# Altium PCB top.PcbDoc (part 2 of 2)
Units mm, origin at the board's own origin, x right, y up, seen from the top; angles counter-clockwise.
Board outline 63 x 37 mm, 4 copper layers (L1 (SIG/PWR), L2 (GND), L3 (GND), L4 (SIG/PWR)), stack 1.586 mm thick; 82 components, 50 nets, 261 pads, 300 vias.
Unrouted connection lines stored in the file: 3.
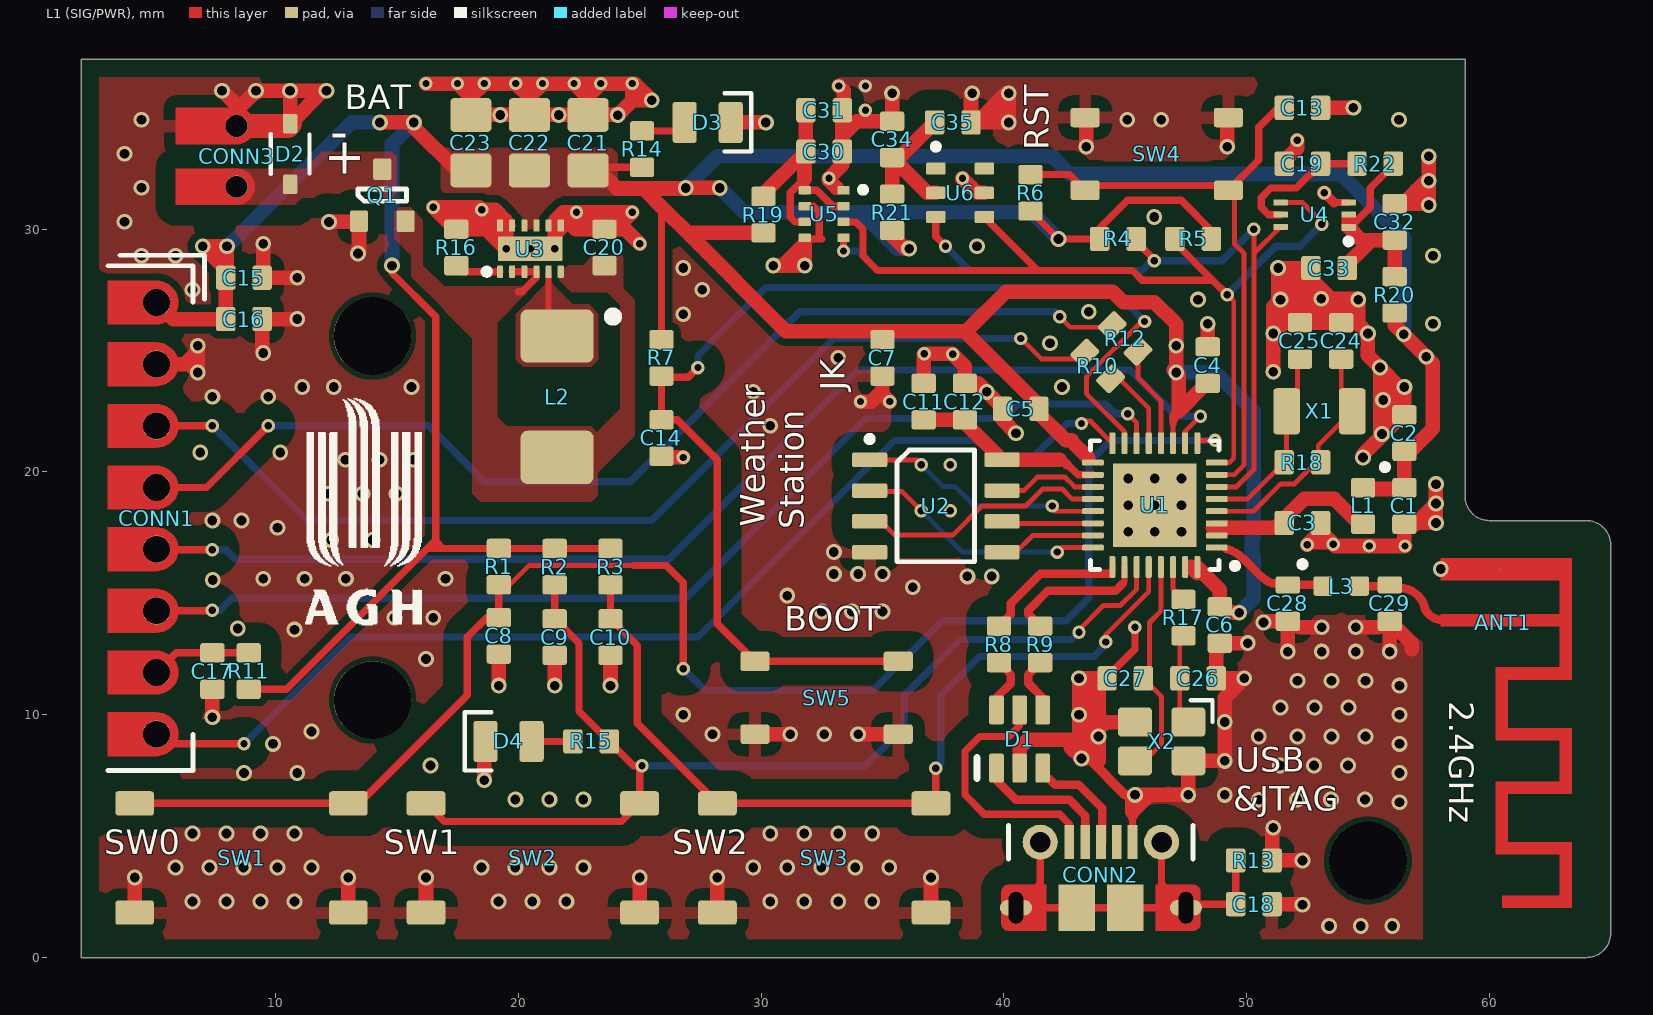
[diagram p0: L1 (SIG/PWR) view]

## Via types
v1: diameter 0.65, hole 0.4, L1 (SIG/PWR) to L4 (SIG/PWR), tented both sides, 228 vias
v2: diameter 0.55, hole 0.3, L1 (SIG/PWR) to L4 (SIG/PWR), tented both sides, 60 vias
v3: diameter 0.6, hole 0.4, L1 (SIG/PWR) to L4 (SIG/PWR), tented both sides, 9 vias
v4: diameter 0.5, hole 0.3, L1 (SIG/PWR) to L4 (SIG/PWR), tented both sides, 3 vias

## Nets (pads, with @x,y where several pads share a name; then routed paths per layer and width w, separated by ;. In a path a pad name is that pad's centre, name@x,y a point inside that pad or via, vN(x,y) a via of type N, cw(c..) or ccw(c..) an arc to the next point about the centre after c; other vN are vias at no path point) (continued)
USB_N: (continued)
  L1 (SIG/PWR) w0.35: D1.1 39.7,7.3 40.5,6.5 42.7,6.5 43.35,5.85 CONN2.2
USB_P: CONN2.3 D1.3 | length 4.7
  L1 (SIG/PWR) w0.35: D1.3 41.6,7.62 42.02,7.2 42.11,7.11 43.094,7.11 44.06,6.144 44.06,4.75 CONN2.3
USB_P_N: D1.6 R8.2 | length 2.4
  L1 (SIG/PWR) w0.35: D1.6 39.7,10.705 40.295,11.3 40.295,11.655 R8.2
USB_P_P: D1.4 R9.2 | length 2.4
  L1 (SIG/PWR) w0.35: R9.2 41.005,11.655 41.005,11.3 41.6,10.705 D1.4
VBAT+: CONN3.1 D2.1 Q1.3
VBUS: CONN2.1 D1.5 | length 10.7
  L1 (SIG/PWR) w0.3: D1.5 40.65,9.55 40.2,9.1 39,9.1 38.4,8.5 38.4,6.7 39.2,5.9 42.3,5.9 42.7,5.5 CONN2.1
VIN: C20.2 L2.2 Q1.2 U3.2 U3.3 U3.4 U3.6 | length 2.2
  L1 (SIG/PWR) w0.3: U3.2 U3.4 20.75,28.025 20.15,27.425 20,27.425
XTAL_32K_N: C25.2 R18.1 U1.5 X1.2 | length 7.9
  L1 (SIG/PWR) w0.2: U1.5 50.034,18.884 R18.1 51.65,20.5 X1.2 ; X1.2@51.55,22.5 52.1,23.05 C25.2@52.1,24.65
XTAL_32K_P: C24.2 R18.2 U1.4 X1.1 | length 10
  L1 (SIG/PWR) w0.2: U1.4 50.284,18.384 51.409,19.509 51.973,19.509 52.864,20.4 52.95,20.4 52.95,21.1 X1.1 ; C24.2 53.9,22.85 X1.1@54.25,22.5
XTAL_N: C27.2 U1.29 X2.3 | length 9.3
  L1 (SIG/PWR) w0.2: X2.3 45.8,8.1 46.5,8.8 46.5,10.75 C27.2 46,11.75 46,13.8 46.471,14.271 U1.29
XTAL_P: R17.2 U1.30 | length 1.5
  L1 (SIG/PWR) w0.2: U1.30 46.971,15.179 R17.2
XTAL_P_RES: C26.2 R17.1 X2.1 | length 4
  L1 (SIG/PWR) w0.2: C26.2@47.4,11.65 C26.2 ; R17.1 47.25,13.1 C26.2 ; X2.1 47.25,10.05 C26.2
pads on no net: CONN2.4 U6.1 U6.6
copper on no net: | length 1.3
  L1 (SIG/PWR) w0.6: 10.6,34.35 10.6,35.7

## Polygon pours and split planes (outlines as drawn)
GND on L1 (SIG/PWR) "NONET_L-01_P-001" (solid, remove dead copper, pour order 16): 2.75,36.25 58.25,36.25 58.25,17.15 58.1,17 57.25,17 57.25,0.75 2.75,0.75
VIN on L1 (SIG/PWR) "NONET_L-01_P-001" (solid, remove dead copper, pour order 15): 19.1,26.479 19.1,24.7 18.9,24.7 17.8,25.8 15.6,28 15.6,28.9 14.9,29.6 14.9,30.7 15.1,30.9 15.575,30.9 16.075,30.4 16.075,28.525 16.95,27.65 20.271,27.65
VIN on L1 (SIG/PWR) "NONET_L-01_P-001" (solid, remove dead copper, pour order 3): 23.369,27.7 24.2,26.869 24.2,22.6 23,21.4 23,19.7 24.8,21.5 24.8,27.1 24.2,27.7
VIN on L1 (SIG/PWR) "NONET_L-01_P-001" (solid, remove dead copper, pour order 2): 20.6,28.525 20.9,28.525 20.9,27.925 19.125,26.15 19.125,22.275 19.525,21.875 23,21.875 23.275,21.6 23.275,19.025 23,18.75 22.975,18.775 18.425,18.775 18.1,19.1 18.1,26.025 19.725,27.65 20.375,27.65 20.6,27.875
VBAT+ on L1 (SIG/PWR) "NONET_L-01_P-001" (solid, remove dead copper, pour order 13): 8,32.5 11.2,32.5 11.9,33.2 14.8,33.2 15,33 15,31.5 14.8,31.3 11.1,31.3 10.8,31 8,31
+3V3 on L1 (SIG/PWR) "NONET_L-01_P-001" (solid, remove dead copper, pour order 9): 20.9,29.875 20.1,29.875 20.1,30.45 19.125,31.425 17.025,31.425 16.8,31.65 16.8,33.15 17.025,33.375 17.05,33.35 23.85,33.35 24.1,33.1 24.1,31.375 21.825,31.375 20.9,30.45
VIN on L1 (SIG/PWR) "NONET_L-01_P-001" (solid, remove dead copper, pour order 6): 21.6,28.525 21.6,27.975 22.175,27.4 24,27.4 23.975,27.425 23.975,27.4 24.15,27.4 24.325,27.575 24.325,28.875 24.275,28.925 23.075,28.925 22.675,28.525
TPS_SW on L1 (SIG/PWR) "NONET_L-01_P-001" (solid, remove dead copper, pour order 5): 21.1,28.525 21.4,28.525 21.4,27.75 22.25,26.9 22.925,26.9 23.3,26.525 23.3,24.625 23,24.325 20.2,24.325 19.9,24.625 19.9,26.575 21.1,27.775
+3V3 on L1 (SIG/PWR) "NONET_L-01_P-001" (solid, remove dead copper, pour order 4): 43.2,20.275 43.225,20.25 44.1,20.25 44.125,20.275 44.125,20.475 44.1,20.5 44.1,20.525 43.925,20.525 43.75,20.7 43.2,20.7
GND on L4 (SIG/PWR) "NONET_L-01_P-001" (solid, remove dead copper, pour order 14): 2.75,36.25 58.25,36.25 58.25,17.15 58.1,17 57.25,17 57.25,0.75 2.75,0.75
GND on L3 (GND) (split plane): 58.49,19 58.49,18.998 58.499,18.831 58.527,18.664 58.574,18.501 58.639,18.345 58.721,18.196 58.819,18.058 58.871,18 58.7,18 58.7,15.3 57.7,15.3 57.7,0.51 2.51,0.51 2.51,36.49 58.49,36.49
GND on L2 (GND) (split plane): 58.49,19 58.49,18.998 58.499,18.831 58.527,18.664 58.574,18.501 58.639,18.345 58.721,18.196 58.819,18.058 58.871,18 58.7,18 58.7,15.3 57.7,15.3 57.7,0.51 2.51,0.51 2.51,36.49 58.49,36.49

## Other copper
L1 (SIG/PWR):
  pour cut-out: 58.5,18 65,18 65,0 57.7,0 57.7,17 58.5,17
L4 (SIG/PWR):
  pour cut-out: 19.1,27 24.1,27 24.1,20.25 19.1,20.25
  pour cut-out: 58.5,18 65,18 65,0 57.7,0 57.7,17 58.5,17
L2 (GND) (plane layer: these items are gaps in the copper):
  pour cut-out: 19.1,27 24.1,27 24.1,20.25 19.1,20.25
  pour cut-out: 58.7,18 65,18 65,0 57.7,0 57.7,15.3 58.7,15.3
L3 (GND) (plane layer: these items are gaps in the copper):
  pour cut-out: 19.1,27 24.1,27 24.1,20.25 19.1,20.25
  pour cut-out: 58.7,18 65,18 65,0 57.7,0 57.7,15.3 58.7,15.3

## Silkscreen, mask and mechanical layers (free items; w line width, h text height)
Top Overlay:
  drawing of 16 lines, arcs and shapes, not listed
  text "BAT" at 12.85,34.95 h1
  text "-" at 12.25,33.3 h1.5
  text "RST" at 41.85,33.25 h1 r90
  text "JK" at 33.45,23.35 h1 r90
  text "Weather" at 30.15,17.75 h1 r90
  text "Station" at 31.75,17.65 h1 r90
  text "BOOT" at 30.95,13.45 h1
  text "2.4GHz" at 58.35,10.55 h1 r270
  text "USB" at 49.55,7.65 h1
  text "&JTAG" at 49.45,6.05 h1
  text "SW0" at 2.95,4.25 h1
  text "SW1" at 14.45,4.25 h1
  text "SW2" at 26.35,4.25 h1
Bottom Overlay:
  text "3V3" at 9.45,26.43 h1
  text "GND" at 9.45,23.89 h1
  text "MOSI" at 10.05,21.35 h1
  text "CLK" at 9.45,18.81 h1
  text "CS" at 8.45,16.27 h1
  text "DC" at 8.45,13.73 h1
  text "RST" at 9.45,11.19 h1
  text "BUSY" at 10.45,8.65 h1

## Text inside footprints (layer, text, board x,y; h text height)
CONN3: Top Overlay "+" at 13.5,32.05 h1.5 r90
D3: Mechanical 13 "+" at 26.033,33.4 h1 r180
D4: Mechanical 13 "+" at 21.367,9.9 h1